# Altium PCB Sensor.PcbDoc
Units mm, origin at the board's own origin, x right, y up, seen from the top; angles counter-clockwise.
Board outline 97.5 x 13 mm, 2 copper layers (Top Layer, Bottom Layer); 29 components, 18 nets, 68 pads, 24 vias.
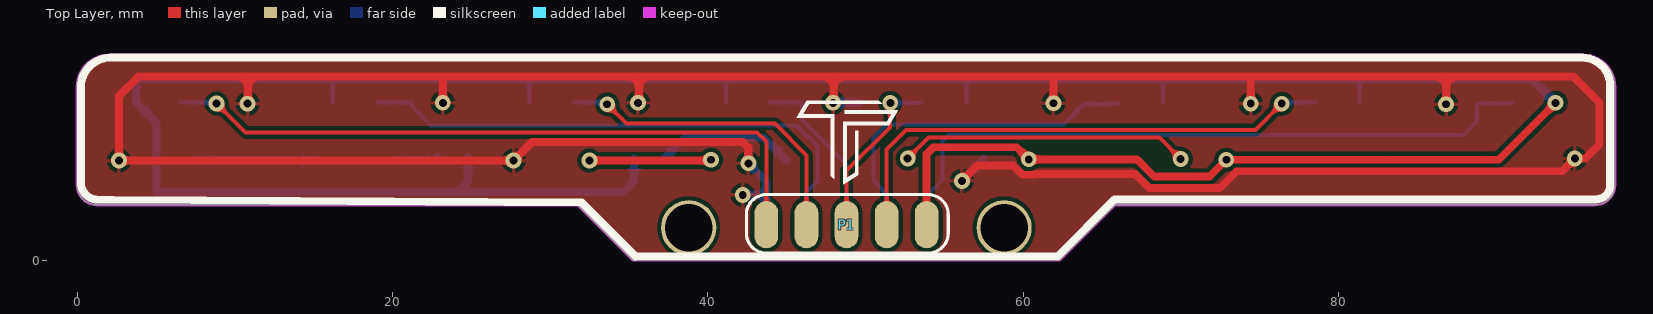
[diagram p0: Top Layer view]
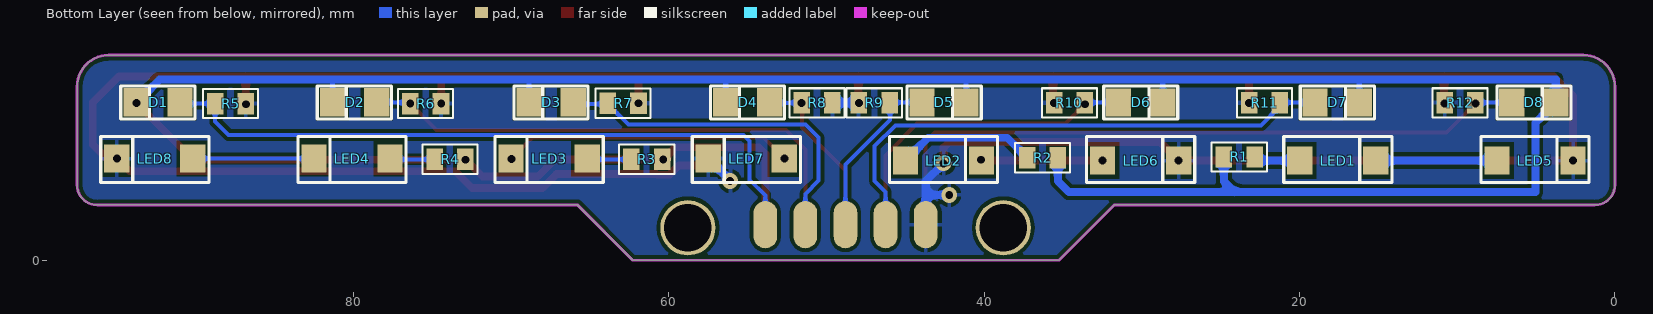
[diagram p1: Bottom Layer view, seen from below]
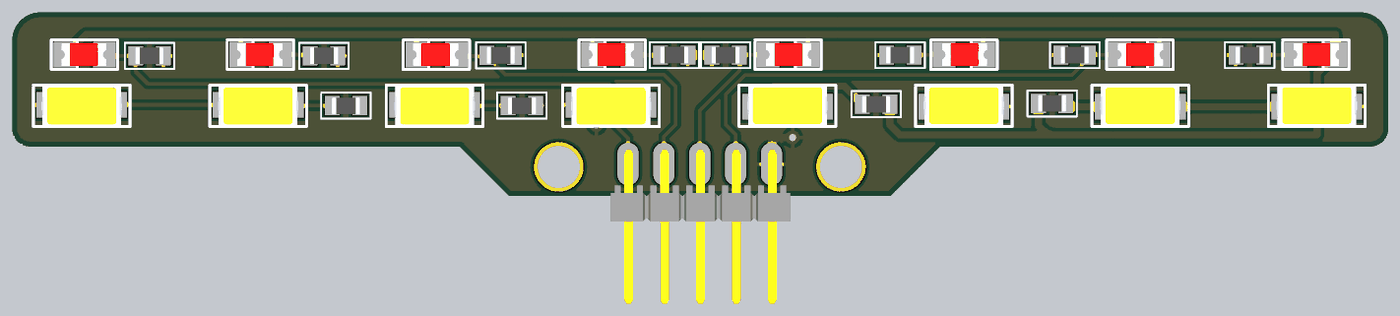
[diagram p2: 3D render of the assembled board from below, using the file's embedded part models]

## Layer stack, top to bottom
Top Solder: solder mask 0.0102, Solder Resist, Dk 3.5
Top Layer: signal copper 0.0356
Dielectric 1: dielectric 0.32, FR-4, Dk 4.8
Bottom Layer: signal copper 0.0356
Bottom Solder: solder mask 0.0102, Solder Resist, Dk 3.5

## Board outline
1.27,3.5 31.74,3.5 35.239,0 62.276,0 65.761,3.485 65.761,3.5 96.23,3.5 ccw(c96.23,4.77) 97.5,4.77 97.5,5.405 97.5,11.005 ccw(c95.5,11.005) 95.5,13.005 2,13.005 ccw(c2,11.005) 0,11.005 0,4.77 ccw(c1.27,4.77)

## Design rules (kind name [scope] priority, off if disabled: settings)
Clearance [All] p1: gap=0.229 ignorepadtopadclearanceinfootprint=FALSE except(0: Arc-Hole Track-Hole SMDPad-Hole THPad-Hole Via-Hole Fill-Hole Poly-Hole Region-Hole Text-Hole; 0.254: Arc-Poly Track-Poly SMDPad-Poly THPad-Poly Via-Poly Fill-Poly Poly-Poly Poly-Region Poly-Text)
PolygonConnect [All] p1: connectstyle=Relief reliefconductorwidth=0.254 reliefentries=4 polygonreliefangle="90 Angle" airgapwidth=0.254
RoutingVias [All] p1: holewidth=0.711 width=1.27 viastyle="Through Hole" minholewidth=0.5 minwidth=1 maxholewidth=0.711 maxwidth=1.27
SolderMaskExpansion [All] p1: expansion=0.102 istentingtop=FALSE
Width [All] p1: maxlimit=10 minlimit=0.254 preferedwidth=0.254
30 further rules are at their usual default settings.

## Components (designator, comment, footprint, x,y, rotation, side; value= is the part's Value field where it differs from the comment)
D1 "Led" LED1206 92.395,9.926 r0 bottom locked
D2 "Led" LED1206 79.931,9.926 r0 bottom locked
D3 "Led" LED1206 67.467,9.926 r0 bottom locked
D4 "Led" LED1206 55.002,9.926 r0 bottom locked
D5 "Led" LED1206 42.513,10.078 r180 bottom locked
D6 "Led" LED1206 30.049,10.078 r180 bottom locked
D7 "Led" LED1206 17.585,10.078 r180 bottom locked
D8 "Led" LED1206 5.12,10.078 r180 bottom locked
LED1 "HSMH-C170" LED5730 17.57,6.446 r180 bottom locked
LED2 "HSMH-C170" LED5730 42.571,6.446 r180 bottom locked
LED3 "HSMH-C170" LED5730 67.572,6.319 r0 bottom locked
LED4 "HSMH-C170" LED5730 80.072,6.319 r0 bottom locked
LED5 "HSMH-C170" LED5730 5.07,6.446 r180 bottom locked
LED6 "HSMH-C170" LED5730 30.07,6.446 r180 bottom locked
LED7 "HSMH-C170" LED5730 55.071,6.319 r0 bottom locked
LED8 "HSMH-C170" LED5730 92.573,6.319 r0 bottom locked
P1 "Header 5x2" "Header 5x2N" 48.758,-2.088 r0 top
R1 "33R" "R 0805" 23.815,6.548 r0 bottom
R2 "33R" "R 0805" 36.286,6.497 r180 bottom
R3 "33R" "R 0805" 61.381,6.395 r180 bottom
R4 "33R" "R 0805" 73.853,6.395 r180 bottom
R5 "3k3" "R 0805" 87.772,9.926 r0 bottom
R6 "3k3" "R 0805" 75.402,9.926 r0 bottom
R7 "3k3" "R 0805" 62.88,9.951 r0 bottom
R8 "3k3" "R 0805" 50.586,9.977 r0 bottom
R9 "R" "R 0805" 46.954,9.977 r180 bottom
R10 "R" "R 0805" 34.584,9.977 r180 bottom
R11 "R" "R 0805" 22.215,9.977 r180 bottom
R12 "R" "R 0805" 9.819,9.977 r180 bottom

## Footprints (in the part's own frame and the unit in brackets; to place one, negate y for a bottom-side part, rotate by r counter-clockwise, add the part's x,y. Pads: shape width x height; smd on the part's side, far side on the other; paste and mask are expansions set on the pad)
"Header 5x2N" [mm] "Header 5x2 no box"
  oval 1.5x3 smd: 1(5.105,4.343) 3(2.565,4.343) 5(0.025,4.343) 7(-2.515,4.343) 9(-5.055,4.343)
  oval 1.5x3 smd far side: 2(5.105,4.343) 4(2.565,4.343) 6(0.025,4.343) 8(-2.515,4.343) 10(-5.055,4.343)
  silkscreen extent -6.32,2.54 6.48,6.25, body extent -6.38,-5.56 6.32,5.36, height 2.11
LED1206 [mm] "LED1206"
  rect 1.6x1.8 smd: 1(-1.425,-0.077) 2(1.375,-0.077)
  silkscreen extent -2.36,-1.12 2.34,0.97, body extent -1.57,-0.88 1.63,0.72, height 1.1
LED5730 [mm] "LED5730"
  rect 1.6x1.8 smd: 1(-2.413,-0.127) 2(2.413,-0.127)
  silkscreen extent -3.43,-1.52 3.43,1.4, body extent -2.85,-1.55 2.85,1.45, height 0.9
"R 0805" [mm] "Chip Resistor, 2-Leads, Body 2.0x1.3mm, IPC Medium Density"
  rect 1.05x1.35 smd: 1(-0.975,0) 2(0.975,0)
  silkscreen extent -1.75,-0.92 1.75,0.92, body extent -1,-0.61 1,0.59, height 0.5

## Part data
D1 D2 D3 D4 D5 D6 D7 D8: "Typical LED"
LED1 LED2 LED3 LED4 LED5 LED6 LED7 LED8: library part LED_1, "Typical GaAs SMD LED"
R1 R2 R3 R4 R5 R6 R7 R8 R9 R10 R11 R12: library part Resistor, "Resistor"

## Free pads (board coordinates)
  round 3.5 hole 3: 0(38.775,2.052) 1(58.775,2.052)

## Via types
v1: diameter 1, hole 0.5, Top Layer to Bottom Layer, tented both sides, 24 vias

## Nets (pads, with @x,y where several pads share a name; then routed paths per layer and width w, separated by ;. In a path a pad name is that pad's centre, name@x,y a point inside that pad or via, vN(x,y) a via of type N, cw(c..) or ccw(c..) an arc to the next point about the centre after c; other vN are vias at no path point)
7V: D1.2 D2.2 D3.2 D4.2 D5.2 D6.2 D7.2 D8.2 P1.1 R1.2 R2.2 R3.2 R4.2 | length 188.7
  Top Layer w0.5: P1.1 53.863,6.73 54.295,7.161 59.574,7.161 v1(60.34,6.395) 67.198,6.395 68.298,5.295 71.787,5.295 v1(72.862,6.37) 90.134,6.37 v1(93.741,9.977)
  Bottom Layer w0.254: D7.2 16.21,11.447 ; D6.2 28.674,11.447 ; D5.2 41.138,11.447 ; D4.2 56.377,11.447 ; D3.2 68.842,11.447 ; D2.2 81.306,11.447
  Bottom Layer w0.5: R1.2 24.79,4.983 24.12,4.313 ; R2.2@35.321,6.446 35.321,5.024 34.61,4.313 24.12,4.313 ; v1(93.741,9.977) 92.271,11.447 81.306,11.447 68.842,11.447 56.377,11.447 41.138,11.447 28.674,11.447 16.21,11.447 3.745,11.447 D8.2 5.044,8.703 5.044,4.313 24.12,4.313
GND: LED5.2 LED6.2 LED7.2 LED8.2 P1.10 R5.1 R6.1 R7.1 R8.1 R9.1 R10.1 R11.1 R12.1 | length 207.6
  Top Layer w0.5: v1(10.81,9.926) 10.835,9.951 10.835,11.653 ; v1(23.19,9.977) 23.19,11.618 23.154,11.653 ; v1(35.559,9.977) 35.626,10.043 35.626,11.653 ; v1(42.56,6.141) 42.56,7.136 42.204,7.492 28.848,7.492 v1(27.676,6.319) v1(2.657,6.319) 2.657,10.409 3.901,11.653 10.835,11.653 ; v1(47.929,9.977) 47.97,10.018 47.97,11.653 ; v1(56.098,5.024) 57.089,6.014 59.337,6.014 59.935,5.417 60.745,5.417 60.784,5.456 67.107,5.456 67.996,4.567 72.443,4.567 73.518,5.641 94.155,5.641 v1(94.96,6.446) 95.621,6.446 96.51,7.335 96.51,10.002 94.859,11.653 86.807,11.653 ; v1(61.905,9.951) 61.905,11.593 61.966,11.653 ; v1(74.412,9.926) 74.412,11.628 74.386,11.653 ; v1(86.797,9.885) 86.807,9.895 86.807,11.653 ; 10.835,11.653 23.154,11.653 ; 23.154,11.653 35.626,11.653 ; 35.626,11.653 47.97,11.653 ; 47.97,11.653 61.966,11.653 ; 61.966,11.653 74.386,11.653 ; 74.386,11.653 86.807,11.653
  Bottom Layer w0.5: v1(42.204,4.135) 43.703,4.135 ; v1(42.56,6.141) 43.703,4.998 43.703,4.135 ; P1.10 43.703,4.135 ; v1(47.929,9.977) R8.1 ; v1(56.098,5.024) 56.098,5.06 LED7.2 ; v1(74.412,9.926) R6.1 ; v1(86.797,9.885) R5.1 ; v1(94.96,6.446) LED8.2
NetLED1_1: LED1.1 R1.1 | length 3
  Bottom Layer w0.5: LED1.1 22.611,6.319 R1.1
NetLED1_2: LED1.2 LED5.1 | length 7.7
  Bottom Layer w0.5: LED5.1 LED1.2
NetLED2_1: LED2.1 R2.1 | length 8.8
  Bottom Layer w0.5: R2.1 38.531,7.767 43.536,7.767 LED2.1
NetLED2_2: LED2.2 LED6.1 | length 7.7
  Top Layer w0.5: v1(32.483,6.319) 40.147,6.319 v1(40.198,6.37)
NetLED3_1: LED3.1 R3.1 | length 2.8
  Bottom Layer w0.254: R3.1 65.108,6.395 LED3.1
NetLED3_2: LED3.2 LED7.1 | length 18.4
  Top Layer w0.254: v1(52.658,6.446) 53.979,7.767 68.62,7.767 v1(69.967,6.421)
NetLED4_1: LED4.1 R4.1 | length 2.9
  Bottom Layer w0.254: R4.1 77.608,6.395 LED4.1
NetLED4_2: LED4.2 LED8.1 | length 7.7
  Bottom Layer w0.254: LED4.2 LED8.1
OUT0: D1.1 P1.2 R5.2 | length 43.5
  Bottom Layer w0.254: P1.2 53.863,4.109 54.854,5.1 54.854,7.564 55.235,7.945 87.899,7.945 88.747,8.793 R5.2 90.893,9.926 D1.1
OUT1: D2.1 P1.3 R6.2 | length 33.2
  Top Layer w0.254: P1.3 51.323,7.005 52.568,8.25 74.701,8.25 v1(76.377,9.926)
  Bottom Layer w0.254: v1(76.377,9.926) 76.454,10.003 D2.1
OUT2: D3.1 P1.4 R7.2 | length 22.3
  Bottom Layer w0.254: P1.4 51.323,4.211 50.485,5.049 50.485,7.767 51.323,8.605 62.55,8.605 63.845,9.901 65.939,9.901 D3.1
OUT3: D4.1 P1.5 R8.2 | length 10.9
  Top Layer w0.254: P1.5 48.783,5.684 51.526,8.427 51.526,9.977 v1(51.561,9.977)
  Bottom Layer w0.254: v1(51.561,9.977) 53.551,9.977 D4.1
OUT4: D5.1 P1.6 R9.2 | length 10.9
  Bottom Layer w0.254: D5.1 45.955,10.001 45.955,8.894 48.783,6.065 P1.6
OUT5: D6.1 P1.7 R10.2 | length 20.6
  Top Layer w0.254: v1(33.609,9.885) 34.838,8.656 44.236,8.656 46.243,6.649 P1.7
  Bottom Layer w0.254: D6.1 33.493,10.001 v1(33.609,9.885)
OUT6: D7.1 P1.8 R11.2 | length 34.5
  Bottom Layer w0.254: D7.1 21.215,10.001 21.215,9.783 22.443,8.554 45.611,8.554 46.929,7.237 46.929,5.024 46.243,4.338 P1.8
OUT7: D8.1 P1.9 R12.2 | length 43.4
  Top Layer w0.254: v1(8.844,9.936) 10.683,8.097 43.119,8.097 43.703,7.513 P1.9
  Bottom Layer w0.254: D8.1 8.779,10.001 v1(8.844,9.936)

## Polygon pours and split planes (outlines as drawn)
GND on Top Layer "GND_L01_P004" (solid, remove dead copper, pour order 4): 0,11.005 cw(c2.045,11.005) 2.045,13.05 2.428,13.05 94.96,13.05 cw(c94.96,10.51) 97.5,10.51 97.5,4.77 cw(c96.23,4.77) 96.23,3.5 94.732,3.5 65.761,3.5 65.761,3.485 62.626,0.305 34.915,0.305 31.74,3.5 1.27,3.5 cw(c1.27,4.77) 0,4.77
GND on Bottom Layer "GND_L02_P002" (solid, remove dead copper, pour order 2): 0,11.005 cw(c2.045,11.005) 2.045,13.05 2.428,13.05 94.96,13.05 cw(c94.96,10.51) 97.5,10.51 97.5,4.77 cw(c96.23,4.77) 96.23,3.5 94.732,3.5 65.761,3.5 65.761,3.485 62.626,0.305 34.915,0.305 31.74,3.5 1.27,3.5 cw(c1.27,4.77) 0,4.77

## Keep-outs
Keep-Out Layer:
  lines w0.178: 0,4.77 ccw(c1.27,4.77) 1.27,3.5 1.717,3.5 31.74,3.5 35.239,0 62.276,0 65.761,3.485 65.761,3.5 95.214,3.5 96.23,3.5 ccw(c96.23,4.77) 97.5,4.77 97.5,5.405 97.5,11.005 ccw(c95.5,11.005) 95.5,13.005 2,13.005 ccw(c2,11.005) 0,11.005 0,5.659 0,4.77

## Silkscreen, mask and mechanical layers (free items; w line width, h text height)
Top Overlay:
  drawing of 16 lines, arcs and shapes, not listed